# EAGLE board PCB (EAGLE 9.7.0)
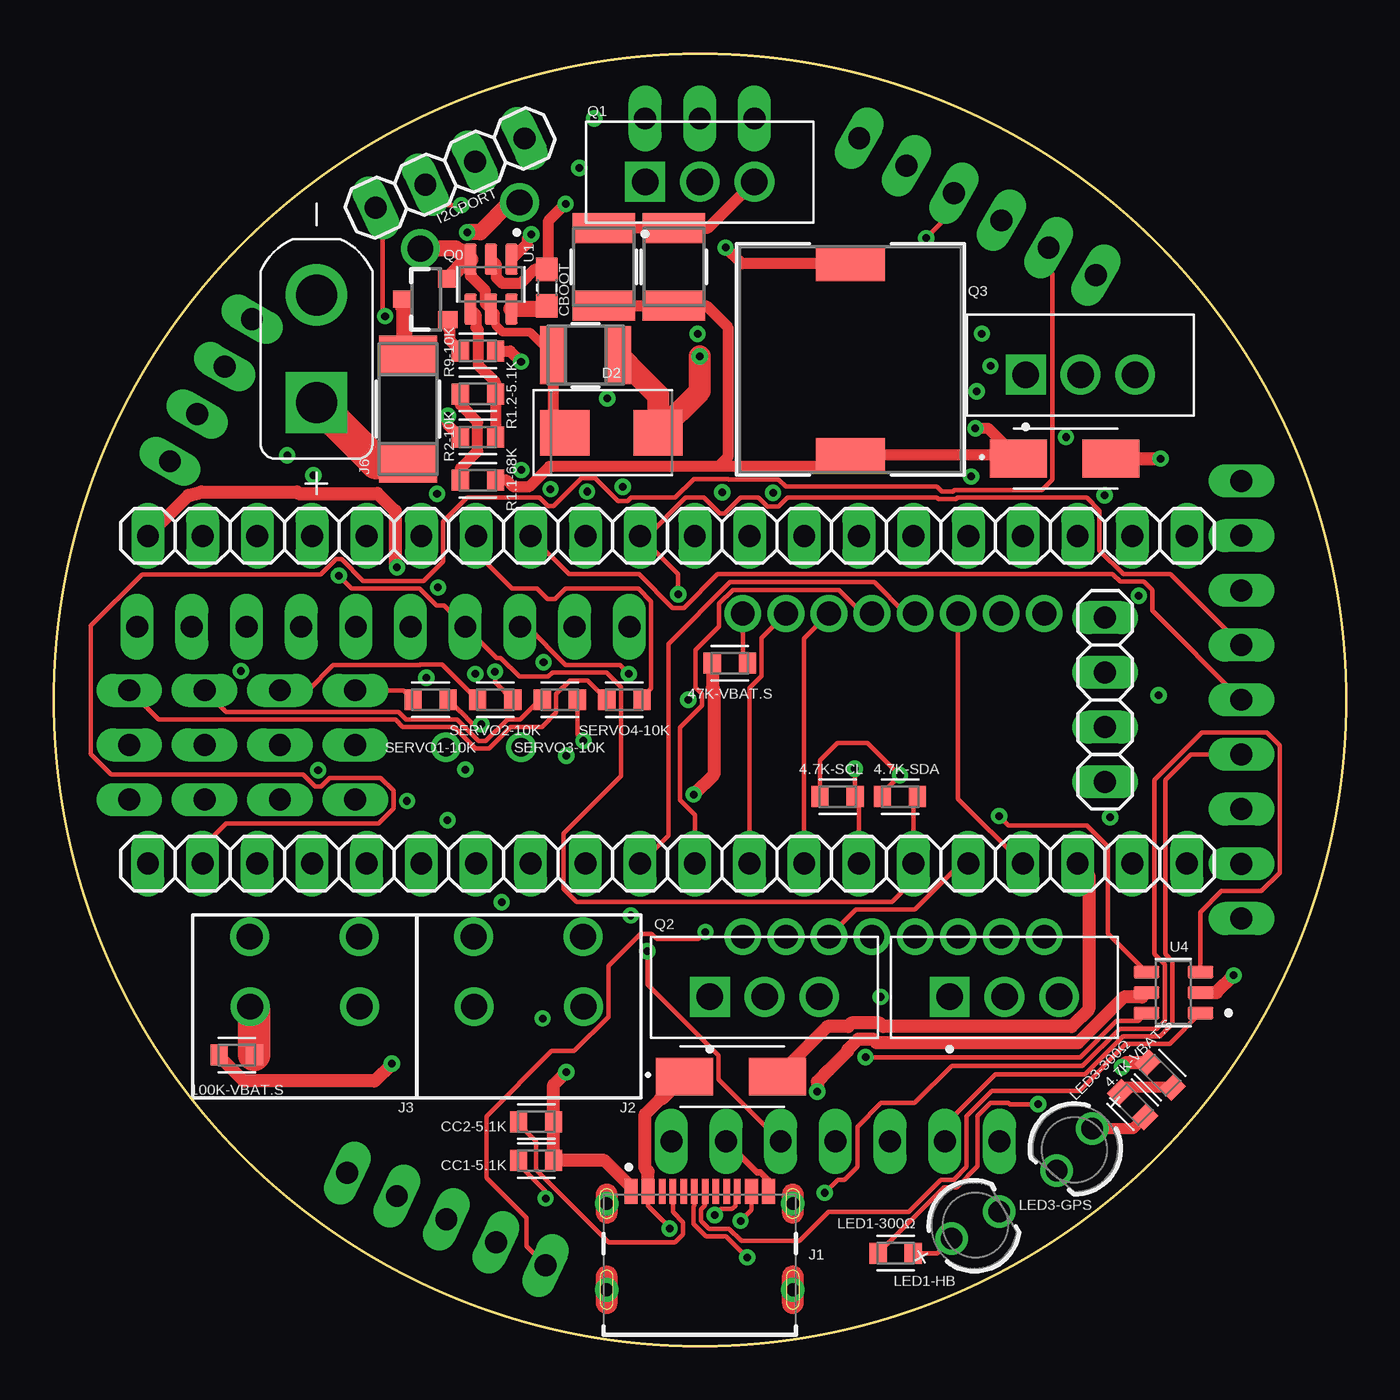
[diagram p0: board, top side]
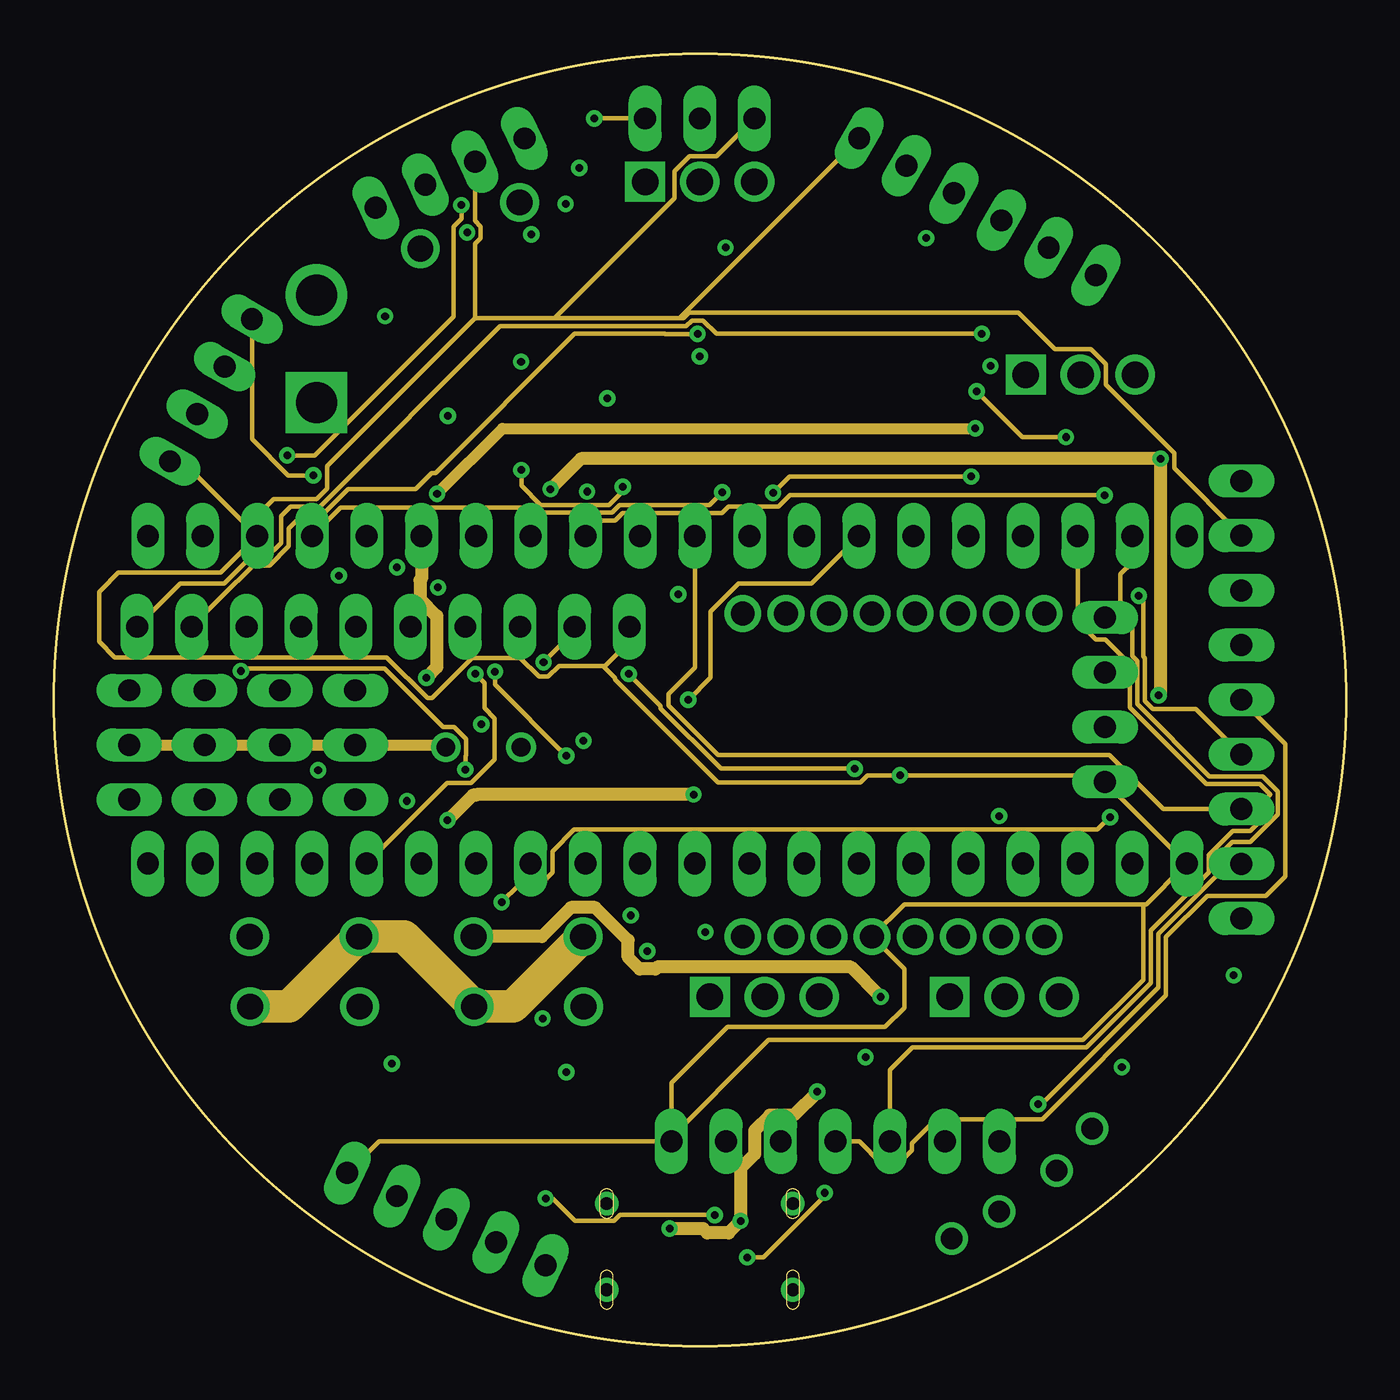
[diagram p1: board, inner layer Route2]
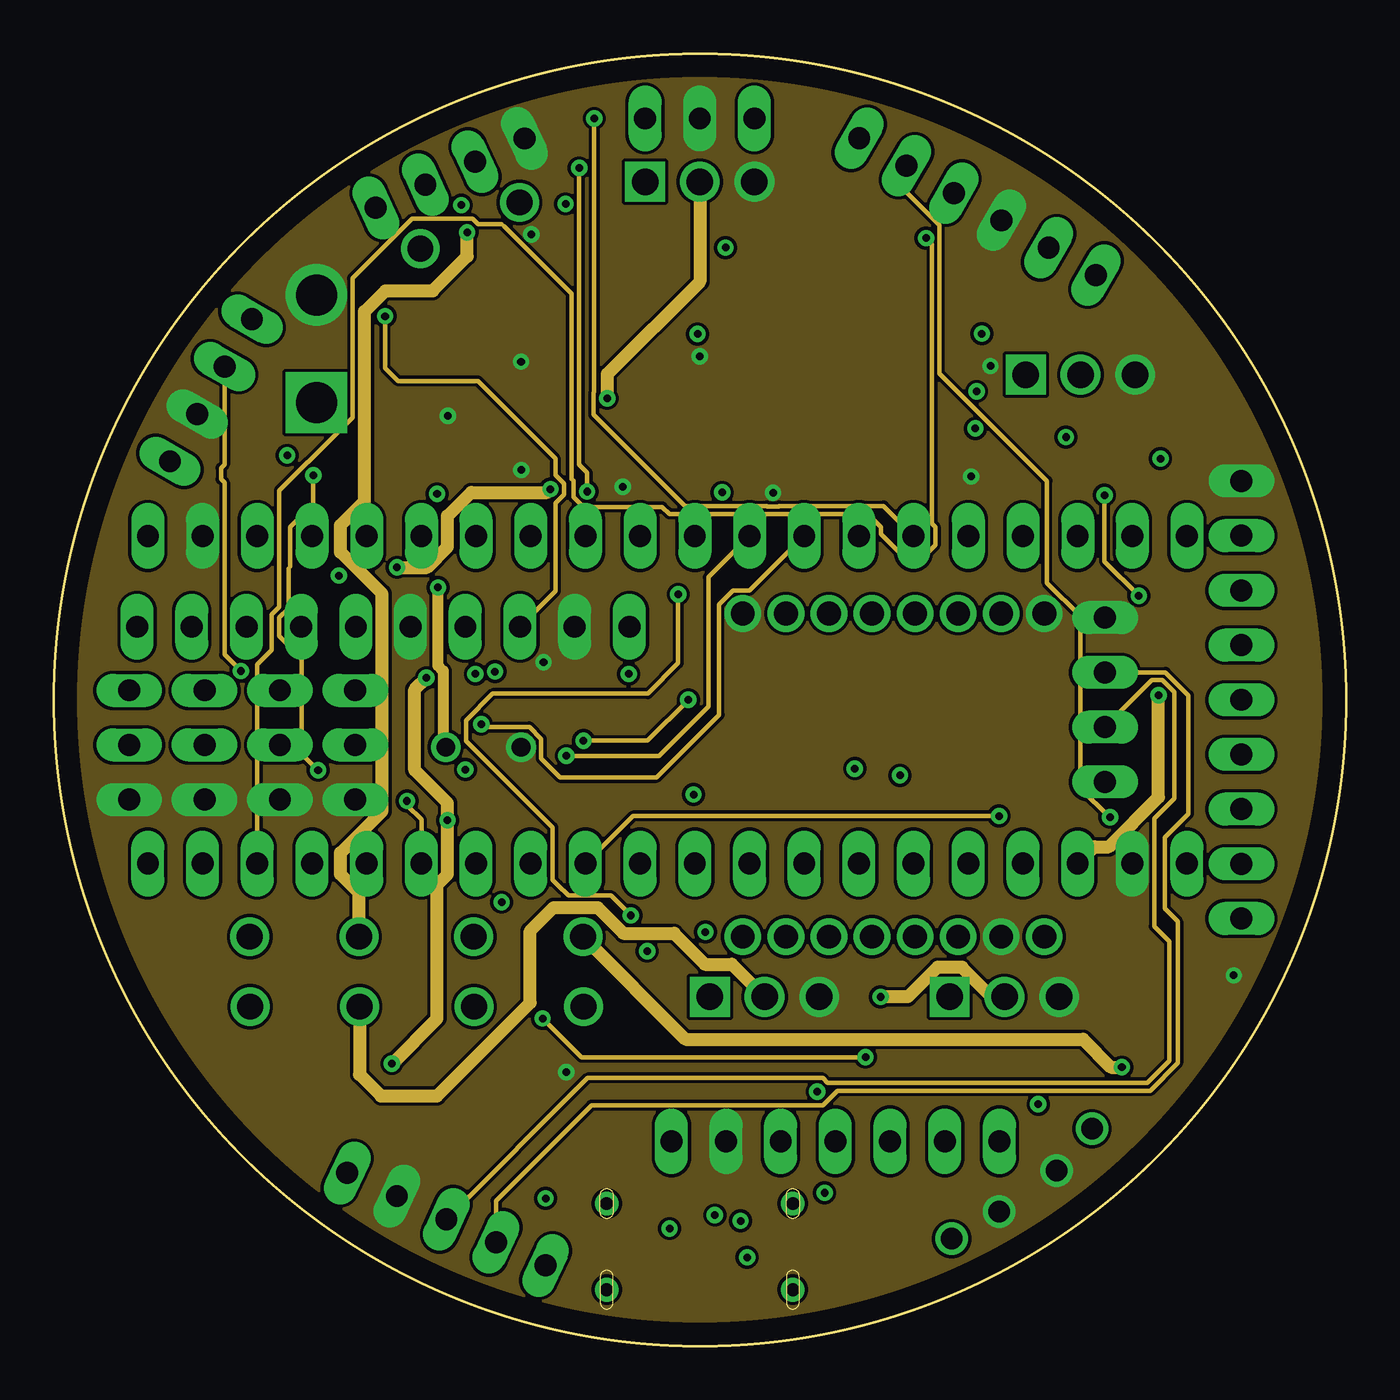
[diagram p2: board, inner layer Route15]
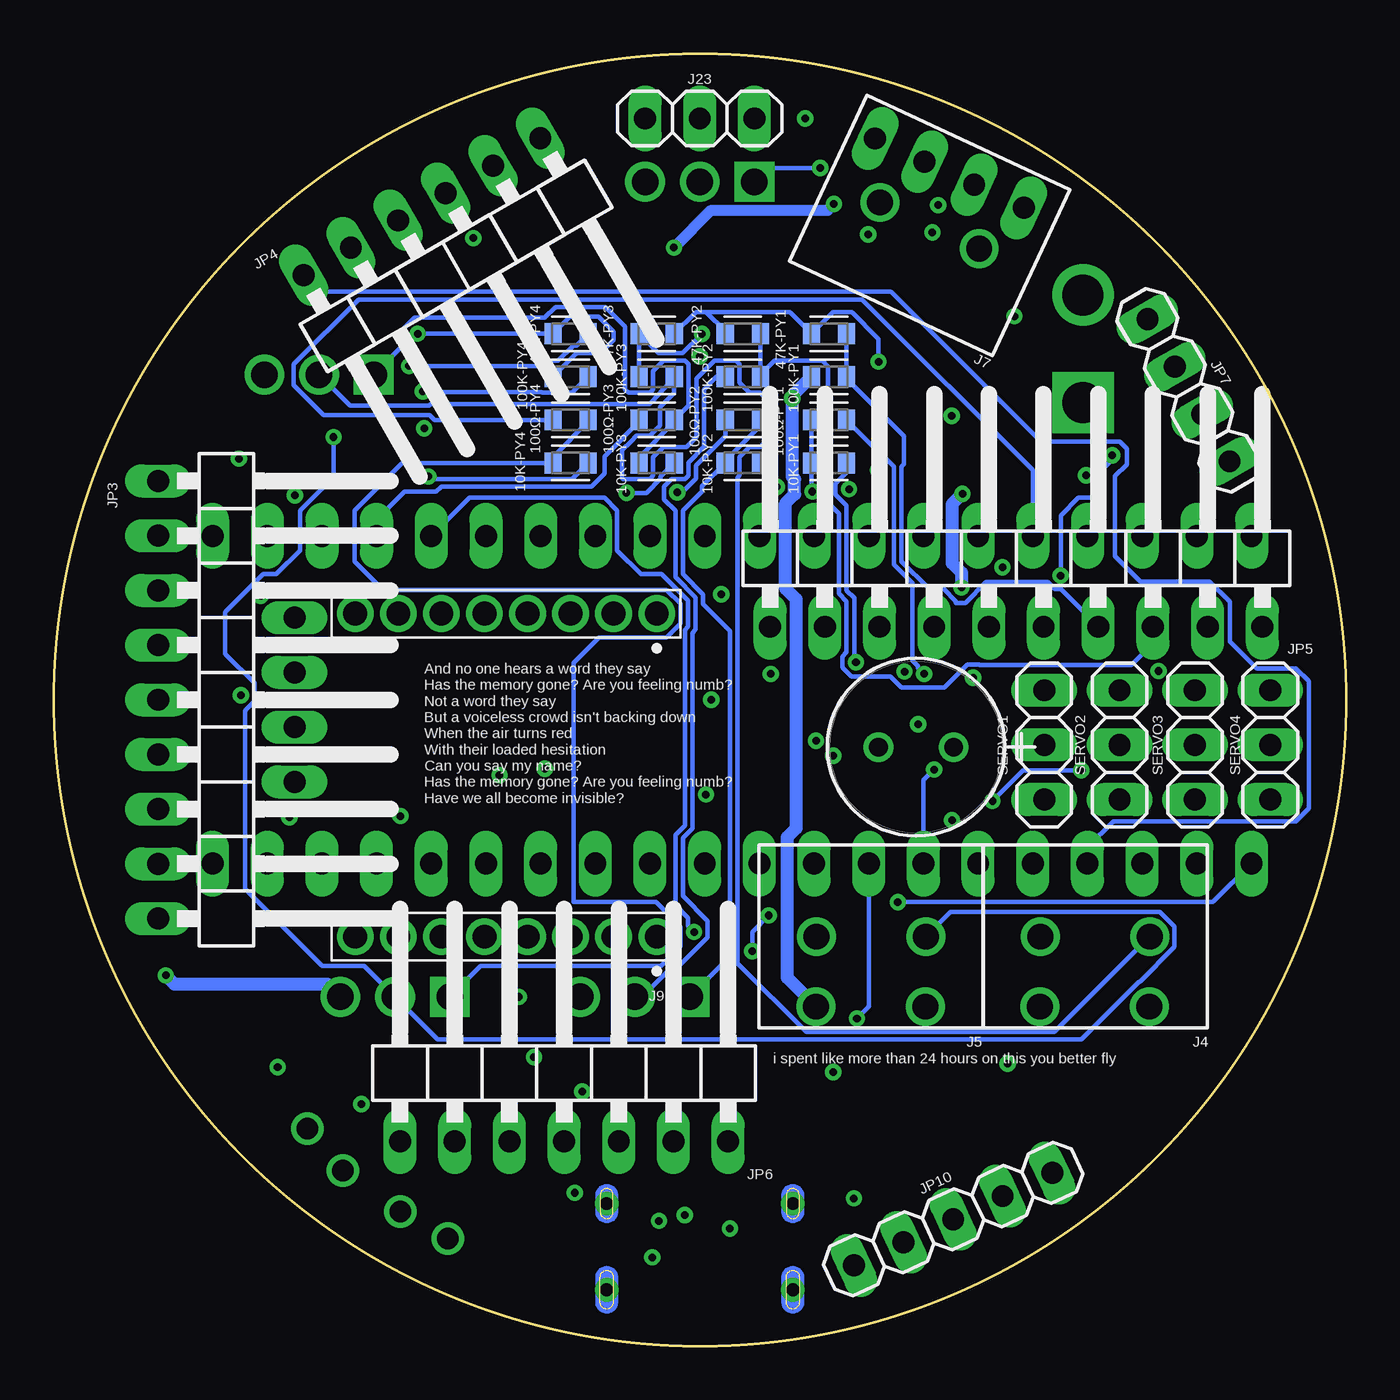
[diagram p3: board, bottom side, seen from below]

Size 60 x 60 mm. Coordinates in mm from the lower left corner, seen from the top.
Outline: circle at 30,30 radius 30
Copper layers (1+2*15+16): Top 0.035mm / dielectric 1.5mm / Route2 0.035mm / dielectric 0.15mm / Route15 0.035mm / dielectric 0.2mm / Bottom 0.035mm
Design rules "Fusion Electronics Design Rules *": minimum track width 6mil, minimum drill 0.35mm, track to track 6mil, track to pad 6mil, pad to pad 6mil, via to via 6mil, smd to smd 6mil, copper to edge 40mil, drill to drill 6mil, minimum pad ring 10mil, minimum via ring 8mil, stop-mask expansion 4mil, vias tented up to drill 9999mil, thermal gap 10mil

## Footprints (pad centres in the part's own frame; a part is rotated, then mirrored left to right if it is on the bottom)
RESC1608X60 = smd 0.799 x 0.974: 1 -0.815,0; 2 0.815,0
CAP_RN_8X11P5_NCH = drill 0.864 pad 1.372: 1 0,0; 2 3.5,0
CAP_C3225-250_TDK = smd 1.397 x 2.896: 1 -1.803,0; 2 1.803,0
CAPC1608X90 = smd 1.1 x 1: 1 -0.85,0; 2 0.85,0
CAP_GRM32DC_MUR = smd 1.168 x 2.692: 1 -1.524,0; 2 1.524,0
SMA = smd 2.65 x 1.75: P1 -2,0; P2 2.3,0
DIOM5336X265N = smd 2.284 x 2.124: 1 -2.164,0; 2 2.164,0
0452SERIES_LTF = smd 1.803 x 2.692: 1 -2.502,0; 2 2.502,0
1X04 = drill 1.016 long: 1 -3.81,0; 2 -1.27,0; 3 1.27,0; 4 3.81,0
GCT_USB4215-03-A_REVA = smd 0.6 x 1.15: A1_B12 -3.2,4.575; A4_B9 -2.4,4.575; B1_A12 3.2,4.575; B4_A9 2.4,4.575 | smd 0.3 x 1.15: A5 -1.25,4.575; A6 -0.25,4.575; A7 0.25,4.575; A8 1.25,4.575; B5 1.75,4.575; B6 0.75,4.575; B7 -0.75,4.575; B8 -1.75,4.575 | drill 0.6 pad 1: SH1 -4.32,4; SH2 4.32,4; SH3 -4.32,0; SH4 4.32,0
TERMBLK_508-2N = drill 1.2: 1 0,0; 2 5.08,0
AMASS_XT30UPB-M = drill 1.9: N 2.5,0 | drill 1.9 square: P -2.5,0
1X8_2MM_HEADER_MODEL = drill 1.105 pad 1.705: 1 0,0; 2 2,0; 3 4,0; 4 6,0; 5 8,0; 6 10,0; 7 12,0; 8 14,0
1X03 = drill 1.016 long: 1 -2.54,0; 2 0,0; 3 2.54,0
1X20 = drill 1.016 long: 1 -24.13,0; 2 -21.59,0; 3 -19.05,0; 4 -16.51,0; 5 -13.97,0; 6 -11.43,0; 7 -8.89,0; 8 -6.35,0; 9 -3.81,0; 10 -1.27,0; 11 1.27,0; 12 3.81,0; 13 6.35,0; 14 8.89,0; 15 11.43,0; 16 13.97,0; 17 16.51,0; 18 19.05,0; 19 21.59,0; 20 24.13,0
1X09/90 = drill 1.016 long: 1 -10.16,-3.81; 2 -7.62,-3.81; 3 -5.08,-3.81; 4 -2.54,-3.81; 5 0,-3.81; 6 2.54,-3.81; 7 5.08,-3.81; 8 7.62,-3.81; 9 10.16,-3.81
1X06/90 = drill 1.016 long: 1 -6.35,-3.81; 2 -3.81,-3.81; 3 -1.27,-3.81; 4 1.27,-3.81; 5 3.81,-3.81; 6 6.35,-3.81
1X10/90 = drill 1.016 long: 1 -11.43,-3.81; 2 -8.89,-3.81; 3 -6.35,-3.81; 4 -3.81,-3.81; 5 -1.27,-3.81; 6 1.27,-3.81; 7 3.81,-3.81; 8 6.35,-3.81; 9 8.89,-3.81; 10 11.43,-3.81
1X07/90 = drill 1.016 long: 1 -7.62,-3.81; 2 -5.08,-3.81; 3 -2.54,-3.81; 4 0,-3.81; 5 2.54,-3.81; 6 5.08,-3.81; 7 7.62,-3.81
1X05 = drill 1.016 long: 1 -5.08,0; 2 -2.54,0; 3 0,0; 4 2.54,0; 5 5.08,0
IND_NC_SUM = smd 1.6 x 3.2: 1 -4.445,0; 2 4.445,0
WL-TMRW_3MM = drill 1: 1 1.27,0; 2 -1.27,0
SOT23-3 = smd 0.9 x 0.8: 1 1,-0.95; 2 1,0.95; 3 -1.1,0
TO254P1054X469X1930-3 = drill 1.23 pad 1.85 square: 1 -2.54,-0.94 | drill 1.23 pad 1.85: 2 0,-0.94; 3 2.54,-0.94
SOT95P280X110-6N = smd 1.45 x 0.59: 1 -1.155,0.95; 2 -1.155,0; 3 -1.155,-0.95; 4 1.155,-0.95; 5 1.155,0; 6 1.155,0.95
SOT95P280X145-6N = smd 1.21 x 0.59: 1 -1.255,0.95; 2 -1.255,0; 3 -1.255,-0.95; 4 1.255,-0.95; 5 1.255,0; 6 1.255,0.95

## Placement (x,y rotation side)
4.7K-SCL  [RESC1608X60]  36.4,25.5 0 top
4.7K-SDA  [RESC1608X60]  39.3,25.5 0 top
4.7K-VBAT.S  [RESC1608X60]  51.38,12.56 135 top
10K-PY1  [RESC1608X60]  24,41 180 bottom
10K-PY2  [RESC1608X60]  28,41 180 bottom
10K-PY3  [RESC1608X60]  32,41 180 bottom
10K-PY4  [RESC1608X60]  36,41 180 bottom
47K-PY1  [RESC1608X60]  24,47 0 bottom
47K-PY2  [RESC1608X60]  28,47 0 bottom
47K-PY3  [RESC1608X60]  32,47 180 bottom
47K-PY4  [RESC1608X60]  36,47 180 bottom
47K-VBAT.S  [RESC1608X60]  31.4,31.7 0 top
100K-PY1  [RESC1608X60]  24,45 0 bottom
100K-PY2  [RESC1608X60]  28,45 0 bottom
100K-PY3  [RESC1608X60]  32,45 180 bottom
100K-PY4  [RESC1608X60]  36,45 180 bottom
100K-VBAT.S  [RESC1608X60]  8.5,13.5 0 top
100Ω-PY1  [RESC1608X60]  24,43 0 bottom
100Ω-PY2  [RESC1608X60]  28,43 180 bottom
100Ω-PY3  [RESC1608X60]  32,43 180 bottom
100Ω-PY4  [RESC1608X60]  36,43 180 bottom
C1  UKT1C471MPD1TDCAP_RN_8X11P5_NCH  [CAP_RN_8X11P5_NCH]  18.2,27.8 180 bottom
C2  22uf  [CAP_C3225-250_TDK]  25.54,50.1 270 top
C3  22uf  [CAP_C3225-250_TDK]  28.8,50.1 270 top
CBOOT  CC0603KRX7R6BB104  [CAPC1608X90]  22.9,49.14 270 top
CC1-5.1K  [RESC1608X60]  22.4,8.6 0 top
CC2-5.1K  [RESC1608X60]  22.4,10.4 0 top
CIN  0.1uf  [CAP_GRM32DC_MUR]  24.7,46 180 top
D1  SS14  [SMA]  46.8,41.2 0 top
D2  ZENERDO-214AA(SMB)  [DIOM5336X265N]  25.9,42.4 0 top
D3  SS14  [SMA]  31.3,12.5 0 top
F1  0452005.MRL0452SERIES_LTF  [0452SERIES_LTF]  16.45,43.5 90 top
I2CPORT  PINHD-1X4  [1X04]  18.41,54.46 205 top
J1  USB4215-03-A_REVAUSB4115-03-C_REVA  [GCT_USB4215-03-A_REVA]  30,2.6 0 top
J2  2828XX-2282837-2  [TERMBLK_508-2N]  24.6,15.75 180 top
J3  2828XX-2282837-2  [TERMBLK_508-2N]  14.2,15.75 180 top
J4  2828XX-2282837-2  [TERMBLK_508-2N]  9.1,19 180 bottom
J5  2828XX-2282837-2  [TERMBLK_508-2N]  19.5,19 180 bottom
J6  XT30UPB-M  [AMASS_XT30UPB-M]  12.2,46.3 90 top
J7  2828XX-2282837-2  [TERMBLK_508-2N]  21.63,53.1 335 bottom
J8  2PH1-08-UACONN8_2PH1_620X79_ADM  [1X8_2MM_HEADER_MODEL]  32,34 180 bottom
J9  2PH1-08-UACONN8_2PH1_620X79_ADM  [1X8_2MM_HEADER_MODEL]  32,19 180 bottom
J23  PINHD-1X3  [1X03]  30,57 0 bottom
JP1  PINHD-1X20  [1X20]  28.5,22.39 0 top
JP2  PINHD-1X20  [1X20]  28.5,37.61 180 top
JP3  PINHD-1X9/90  [1X09/90]  51.35,30 270 bottom
JP4  PINHD-1X6/90  [1X06/90]  41,49.6 210 bottom
JP5  PINHD-1X10/90  [1X10/90]  15.3,37.2 0 bottom
JP6  PINHD-1X7/90  [1X07/90]  36.3,13.3 0 bottom
JP7  PINHD-1X4  [1X04]  7.3,44.37 120 bottom
JP10  PINHD-1X5  [1X05]  18.23,5.87 205 bottom
JP11  PINHD-1X4  [1X04]  48.82,30 90 top
L1  CDRH104RNP-101NCIND_NC_SUM  [IND_NC_SUM]  37,45.8 90 top
LED1-300Ω  [RESC1608X60]  39.1,4.3 0 top
LED1-HB  WL-TMRW_3MM_WITHOUTSTOPPER  [WL-TMRW_3MM]  42.8,5.6 30 top
LED3-300Ω  [RESC1608X60]  50.1,11.2 315 top
LED3-GPS  WL-TMRW_3MM_WITHOUTSTOPPER  [WL-TMRW_3MM]  47.4,9.1 230 top
Q0  AO3401A  [SOT23-3]  17.3,48.6 0 top
Q1  IRLZ44N  [TO254P1054X469X1930-3]  30,55 0 top
Q2  IRLZ44N  [TO254P1054X469X1930-3]  33.01,17.14 0 top
Q3  IRLZ44N  [TO254P1054X469X1930-3]  47.68,46.04 0 top
Q4  IRLZ44N  [TO254P1054X469X1930-3]  44.15,17.14 0 top
R1.1-68K  [RESC1608X60]  19.7,40.2 0 top
R1.2-5.1K  [RESC1608X60]  19.7,44.2 180 top
R2-10K  [RESC1608X60]  19.7,42.2 0 top
R9-10K  [RESC1608X60]  19.7,46.2 180 top
SERVO1  PINHD-1X3  [1X03]  14,27.9 90 bottom
SERVO1-10K  [RESC1608X60]  17.5,30 0 top
SERVO2  PINHD-1X3  [1X03]  10.5,27.9 90 bottom
SERVO2-10K  [RESC1608X60]  20.5,30 0 top
SERVO3  PINHD-1X3  [1X03]  7,27.9 90 bottom
SERVO3-10K  [RESC1608X60]  23.5,30 0 top
SERVO4  PINHD-1X3  [1X03]  3.5,27.9 90 bottom
SERVO4-10K  [RESC1608X60]  26.5,30 0 top
U1  TPS54202DDCR  [SOT95P280X110-6N]  20.3,49.3 270 top
U4  USBLC6-2SC6  [SOT95P280X145-6N]  52,16.4 180 top

## Library data of the parts
4.7K-SCL 4.7K-SDA 4.7K-VBAT.S 10K-PY1-10K-PY4 47K-PY1-47K-PY4 47K-VBAT.S 100K-PY1-100K-PY4 100K-VBAT.S 100Ω-PY1-100Ω-PY4 CC1-5.1K CC2-5.1K LED1-300Ω LED3-300Ω R1.1-68K R1.2-5.1K R2-10K R9-10K SERVO1-10K SERVO2-10K SERVO3-10K SERVO4-10K = Resistor; CATEGORY: Resistors; DESCRIPTION: Chip Resistor 1.60 X 0.82 X 0.60 mm body 0603(1608-METRIC) Package; PACKAGE_SIZE: 0603; PACKAGE_TYPE: Surface Mount
C1 = CAP_RN_8X11P5_NCH; COPYRIGHT: Copyright (C) 2026 Ultra Librarian. All rights reserved.; MANUFACTURER_NAME: Nichicon; MANUFACTURER_PART_NUMBER: UKT1C471MPD1TD
C2 C3 = CAP_C3225-250_TDK; COPYRIGHT: Copyright (C) 2026 Ultra Librarian. All rights reserved.; MANUFACTURER_NAME: TDK; MANUFACTURER_PART_NUMBER: C3225X5R1C226M250AA
CBOOT = CC0603KRX7R6BB104
CIN = CAP_GRM32DC_MUR; COPYRIGHT: Copyright (C) 2026 Ultra Librarian. All rights reserved.; MANUFACTURER_NAME: Murata; MANUFACTURER_PART_NUMBER: GRM32DR71C106KA01L
D1 D3 = SS14; AVAILABILITY: In Stock; CHECK_PRICES: https://www.snapeda.com/parts/SS14/Onsemi/view-part/?ref=eda; DESCRIPTION: Diode Schottky 40 V 1A Surface Mount DO-214AC (SMA); MF: ON Semiconductor; MP: SS14; PACKAGE: SMA-2 ON Semiconductor; PRICE: None; PURCHASE-URL: https://www.snapeda.com/api/url_track_click_mouser/?unipart_id=1413348&manufacturer=ON Semiconductor&part_name=SS14&search_term=None; SNAPEDA_LINK: https://www.snapeda.com/parts/SS14/Onsemi/view-part/?ref=snap
D2 = Diode; CATEGORY: Diode; DESCRIPTION: Zener Diode - Generic Surface Mount DO-214AA(SMB); PACKAGE_SIZE: SMB; PACKAGE_TYPE: Surface Mount; SUBCATEGORY: Zener Diodes
F1 = 0452Series_LTF; COPYRIGHT: Copyright (C) 2026 Ultra Librarian. All rights reserved.; DIGI-KEY_PART_NUMBER_1: F2607CT-ND; DIGI-KEY_PART_NUMBER_2: F2607DKR-ND; DIGI-KEY_PART_NUMBER_3: F2607TR-ND; MANUFACTURER_NAME: Littelfuse Inc; MANUFACTURER_PART_NUMBER: 0452005.MRL
I2CPORT JP7 JP11 = Connector; CATEGORY: Connectors; DESCRIPTION: Header-Straight-4 Position; PACKAGE_TYPE: Through Hole; PITCH: 0.100" (2.54mm); SUBCATEGORY: Headers; TYPE: Male Pins
J1 = USB4215-03-A_REVA; CREATOR: Amina; MANUFACTURER: Global Connector Technology; MAXIMUM_PACKAGE_HEIGHT: 3.16mm; PARTREV: A; STANDARD: Manufacturer Recommendations; VERIFIER: Your name, use the same always
J2-J5 J7 = Connector; CATEGORY: Connectors; DATASHEET: https://www.te.com/usa-en/product-282837-2.datasheet.pdf; DESCRIPTION: 2 Position Wire to Board Terminal Block Horizontal with Board 0.200" (5.08mm) Through Hole; MANUFACTURER: TE Connectivity AMP Connectors; MPN: 282837-2; OPERATING_TEMPERATURE: -40°C ~ 105°C; PACKAGE_SIZE: NA; PACKAGE_TYPE: Through Hole; PART_STATUS: Active; PITCH: 0.200" (5.08mm); ROHS: Compliant; SERIES: Buchanan; SUBCATEGORY: Terminal Blocks; TYPE: Screw Terminal - Rising Cage Clamp Side Wire Entry
J6 = XT30UPB-M; AVAILABILITY: In Stock; CHECK_PRICES: https://www.snapeda.com/parts/XT30UPB-M/AMASS/view-part/?ref=eda; DESCRIPTION: Socket; DC supply; XT30; male; PIN: 2; on PCBs; THT; yellow; 15A; 500V; MF: amass; MP: XT30UPB-M; PACKAGE: None; PRICE: None; SNAPEDA_LINK: https://www.snapeda.com/parts/XT30UPB-M/AMASS/view-part/?ref=snap
J8 J9 = 1x8 2mm Header; COPYRIGHT: Copyright (C) 2026 Ultra Librarian. All rights reserved.; MANUFACTURER_NAME: ADAM TECHNOLOGIES INC; MANUFACTURER_PART_NUMBER: 2PH1-08-UA; TYPE: Headers, Male Pins
J23 SERVO1-SERVO4 = Connector; CATEGORY: Connectors; DESCRIPTION: Header-Straight-3 Position; PACKAGE_TYPE: Through Hole; PITCH: 0.100" (2.54mm); SUBCATEGORY: Headers; TYPE: Male Pins
JP1 JP2 = Connector; CATEGORY: Connectors; DESCRIPTION: Header-Straight-10 Position; PACKAGE_TYPE: Through Hole; PITCH: 0.100" (2.54mm); SUBCATEGORY: Headers; TYPE: Male Pins
JP3 = Connector; CATEGORY: Connectors; DESCRIPTION: Header-Right Angle-9 Position; PACKAGE_TYPE: Through Hole; PITCH: 0.100" (2.54mm); SUBCATEGORY: Headers; TYPE: Male Pins
JP4 = Connector; CATEGORY: Connectors; DESCRIPTION: Header-Right Angle-6 Position; PACKAGE_TYPE: Through Hole; PITCH: 0.100" (2.54mm); SUBCATEGORY: Headers; TYPE: Male Pins
JP5 = Connector; CATEGORY: Connectors; DESCRIPTION: Header-Right Angle-10 Position; PACKAGE_TYPE: Through Hole; PITCH: 0.100" (2.54mm); SUBCATEGORY: Headers; TYPE: Male Pins
JP6 = Connector; CATEGORY: Connectors; DESCRIPTION: Header-Right Angle-7 Position; PACKAGE_TYPE: Through Hole; PITCH: 0.100" (2.54mm); SUBCATEGORY: Headers; TYPE: Male Pins
JP10 = Connector; CATEGORY: Connectors; DESCRIPTION: Header-Straight-5 Position; PACKAGE_TYPE: Through Hole; PITCH: 0.100" (2.54mm); SUBCATEGORY: Headers; TYPE: Male Pins
L1 = IND_NC_SUM; COPYRIGHT: Copyright (C) 2026 Ultra Librarian. All rights reserved.; MANUFACTURER_NAME: Sumida; MANUFACTURER_PART_NUMBER: CDRH104RNP-101NC
LED1-HB LED3-GPS = WL-TMRW_3MM
Q0 = AO3401A; AVAILABILITY: In Stock; CHECK_PRICES: https://www.snapeda.com/parts/AO3401A/Alpha/view-part/?ref=eda; DESCRIPTION: P-Channel 30 V 4A (Ta) 1.4W (Ta) Surface Mount SOT-23-3; MF: Alpha & Omega Semiconductor; MP: AO3401A; PACKAGE: SOT-23 Alpha &amp; Omega Semiconductor; PRICE: None; SNAPEDA_LINK: https://www.snapeda.com/parts/AO3401A/Alpha/view-part/?ref=snap
Q1-Q4 = IRLZ44N; AVAILABILITY: Not in stock; CHECK_PRICES: https://www.snapeda.com/parts/IRLZ44N/Infineon/view-part/?ref=eda; DESCRIPTION: N-Channel 55 V 47A (Tc) 3.8W (Ta), 110W (Tc) Surface Mount D2PAK; MF: Infineon Technologies; MP: IRLZ44N; PACKAGE: TO-220 Infineon; PRICE: None; SNAPEDA_LINK: https://www.snapeda.com/parts/IRLZ44N/Infineon/view-part/?ref=snap
U1 = TPS54202DDCR; AVAILABILITY: In Stock; CHECK_PRICES: https://www.snapeda.com/parts/TPS54202DDCR/Texas+Instruments/view-part/?ref=eda; DESCRIPTION: 4.5V to 28V Input, 2A Output, EMI Friendly Synchronous Step-Down Converter; MF: Texas Instruments; MP: TPS54202DDCR; PACKAGE: SOT-23-THN-6 Texas Instruments; PRICE: None; PURCHASE-URL: https://www.snapeda.com/api/url_track_click_mouser/?unipart_id=565860&manufacturer=Texas Instruments&part_name=TPS54202DDCR&search_term=None; SNAPEDA_LINK: https://www.snapeda.com/parts/TPS54202DDCR/Texas+Instruments/view-part/?ref=snap
U4 = USBLC6-2SC6; AVAILABILITY: In Stock; CHECK_PRICES: https://www.snapeda.com/parts/USBLC6-2SC6/STMicroelectronics/view-part/?ref=eda; DESCRIPTION: 17V Clamp 5A (8/20µs) Ipp Tvs Diode Surface Mount SOT-23-6; MF: STMicroelectronics; MP: USBLC6-2SC6; PACKAGE: SOT-23-6 STMicroelectronics; PRICE: None; PURCHASE-URL: https://www.snapeda.com/api/url_track_click_mouser/?unipart_id=231887&manufacturer=STMicroelectronics&part_name=USBLC6-2SC6&search_term=None; SNAPEDA_LINK: https://www.snapeda.com/parts/USBLC6-2SC6/STMicroelectronics/view-part/?ref=snap

## Nets
3V3: 4.7K-SCL.1 4.7K-SDA.1 I2CPORT.2 J9.4 J23.1 JP1.20 JP2.18 JP3.2 JP4.1 JP5.1 JP6.7 JP7.1 JP10.1 JP11.1
5V: D1.P2 D3.P2 JP1.18 JP2.20
A0-AIN: J23.3 JP2.6
A1-SERVO3: JP2.7 SERVO3-10K.2
A2-SERVO1: JP2.8 SERVO1-10K.2
A3-SERVO2: JP2.9 SERVO2-10K.2
A4-CS: JP2.10 JP3.7
A5-SCL: JP2.11 JP3.4 JP6.5
A6-SDO: JP2.12 JP3.6 JP6.2
A7-SDA: JP2.13 JP3.5 JP6.4
A8-PY1: 100Ω-PY1.2 JP1.5
A9-RX: JP1.6 JP7.4
A10-TX: JP1.7 JP7.3
A11-D-: JP1.8 U4.6
A12-D+: JP1.9 U4.4
A15-NSS: J8.5 JP1.10
ALRT: JP5.6
ANT: J9.8
B0-SERVO4: JP2.14 SERVO4-10K.2
B1-VBAT.S: 47K-VBAT.S.1 100K-VBAT.S.1 JP2.15
B2-PY4: 100Ω-PY4.2 JP2.16
B3-SCK: J8.4 JP1.11
B4-MISO: J8.2 JP1.12
B5-MOSI: J8.3 JP1.13
B6-SCL: 4.7K-SCL.2 I2CPORT.4 JP1.14 JP5.3
B7-SDA: 4.7K-SDA.2 I2CPORT.3 JP1.15 JP5.4
B8-DIO0: J9.3 JP1.16
B9-RESET: J8.6 JP1.17
B10-PY2: 100Ω-PY2.2 JP2.17
B12-CS: JP1.1 JP4.2
B13-CLK: JP1.2 JP4.5
B14-D0: JP1.3 JP4.3
B15-D1: JP1.4 JP4.6
C13: JP2.2 LED1-300Ω.1
C14-CSB: JP2.3 JP6.3
C15-PY3: 100Ω-PY3.2 JP2.4
DIO1: J9.2
DIO2: J9.1
DIO3: J9.6
DIO4: J9.5
DIO5: J8.7
GND: 10K-PY1.1 10K-PY2.1 10K-PY3.1 10K-PY4.1 47K-PY1.1 47K-PY2.1 47K-PY3.1 47K-PY4.1 47K-VBAT.S.2 C1.2 C2.1 C3.1 CC1-5.1K.2 CC2-5.1K.2 CIN.1 D2.2 I2CPORT.1 J1.A1_B12 J1.B1_A12 J6.N J8.1 J8.8 J9.7 J23.2 JP1.19 JP2.19 JP3.1 JP4.4 JP5.2 JP5.5 JP6.6 JP7.2 JP10.2 JP11.4 LED1-HB.1 LED3-GPS.1 Q1.3 Q2.3 Q3.3 Q4.3 R2-10K.1 R9-10K.1 SERVO1.1 SERVO2.1 SERVO3.1 SERVO4.1 U1.1 U4.2
INT1: JP3.8
INT2: JP3.9
N$1: LED1-300Ω.2 LED1-HB.2
N$2: Q0.1 R9-10K.2
N$3: 10K-PY1.2 100Ω-PY1.1 Q1.1
N$4: 100K-PY1.1 J2.1 Q1.2
N$5: 10K-PY2.2 100Ω-PY2.1 Q2.1
N$6: 100K-PY2.1 J3.1 Q2.2
N$7: 4.7K-VBAT.S.2 100K-VBAT.S.2 J2.2 J3.2 J4.2 J5.2 J7.1
N$8: 10K-PY3.2 100Ω-PY3.1 Q3.1
N$9: 100K-PY3.1 J4.1 Q3.2
N$10: LED3-300Ω.2 LED3-GPS.2
N$11: CC2-5.1K.1 J1.A5
N$12: 10K-PY4.2 100Ω-PY4.1 Q4.1
N$13: 100K-PY4.1 J5.1 Q4.2
N$14: CC1-5.1K.1 J1.B5
N$15: J1.A7 U4.1
N$16: J1.A6 U4.3
N$17: 4.7K-VBAT.S.1 LED3-300Ω.1
N$18: CBOOT.2 U1.6
N$19: R1.2-5.1K.1 R2-10K.2 U1.4
N$20: CBOOT.1 L1.2 U1.2
N$21: CIN.2 D2.1 J7.2 Q0.2 U1.3 U1.5
N$22: R1.1-68K.1 R1.2-5.1K.2
N$23: F1.2 Q0.3
N$24: F1.1 J6.P
N$25: D3.P1 J1.A4_B9 J1.B4_A9 U4.5
NRST: JP2.5 JP10.5
PA13-SWDIO: JP10.3 JP11.2
PA14-SWCLK: JP10.4 JP11.3
PS: JP6.1
PY1-A0: 47K-PY1.2 100K-PY1.2 JP5.7
PY2-A1: 47K-PY2.2 100K-PY2.2 JP5.8
PY3-A2: 47K-PY3.2 100K-PY3.2 JP5.9
PY4-A3: 47K-PY4.2 100K-PY4.2 JP5.10
SIG: SERVO1-10K.1 SERVO1.3
SIG1: SERVO2-10K.1 SERVO2.3
SIG2: SERVO3-10K.1 SERVO3.3
SIG3: SERVO4-10K.1 SERVO4.3
V: C1.1 C2.2 C3.2 D1.P1 L1.1 R1.1-68K.2 SERVO1.2 SERVO2.2 SERVO3.2 SERVO4.2
VB: JP2.1
VS: JP3.3

## Tracks (layer width: path | path; a pad name or v marks a point on that pad's centre or on a via)
3V3  (via drill 0.35)
  Top 0.2: 4.7K-SDA.1 38.48,25.68 v39.3,26.49 37.79,28 36.4,28 35.59,27.18 4.7K-SCL.1
  Route2 0.2: JP7.1 5.99,41.07 JP2.18 | 23.26,47.72 19.56,47.72 | J23.1 30.77,55.23 29.51,55.23 28.82,54.55 28.82,53.28 23.26,47.72 | JP4.1 29.05,47.72 | 29.05,47.72 26.6,47.72 23.26,47.72 | JP5.1 26.73,32.7 25.61,31.58 25.5,31.58 | JP1.20 52.47,22.23 | 52.47,22.23 50.74,20.5 50.6,20.5 | 50.6,20.5 39.6,20.5 39.5,20.5 J9.4 39.5,17.5 39.5,15.7 38.6,14.8 33.6,14.8 31.28,14.8 28.68,12.2 JP6.7 | 52.47,22.23 52.47,22.54 JP11.1 48.52,26.49 v39.3,26.49 37.78,26.49 37.46,26.17 30.84,26.17 26.07,30.94 26.07,31.01 25.5,31.58 | 50.6,20.5 50.6,17 47.8,14.2 33.2,14.2 31.6,12.6 29.98,10.98 28.68,9.68 JP6.7 | JP3.2 52.03,40.75 52.03,41.46 48.86,44.64 48.86,45.59 48.17,46.27 46.5,46.27 44.81,47.97 29.49,47.97 29.24,47.72 29.05,47.72 | JP2.18 7.74,35.9 6.1,35.9 3,35.9 2.2,35.1 2.1,35 2.1,32.7 2.83,31.97 15.46,31.97 17.36,30.07 17.56,30.07 19.43,31.94 21.66,31.94 22.53,31.07 22.96,31.07 23.47,31.58 25.5,31.58 | 19.56,47.72 12.68,40.84 12.68,39.8 12.21,39.33 10.2,39.33 9.45,38.58 JP2.18 | JP6.7 15.1,9.49 JP10.1 | I2CPORT.2 19.56,52.24 19.83,51.97 19.83,51.45 19.56,51.18 19.56,47.72
5V  (via drill 0.35)
  Top 0.6: D1.P2 v51.4,41.2 | JP2.20 6.25,39.49 6.85,39.65 11.29,39.65 11.35,39.59 15.03,39.59 15.86,38.76 15.86,36.34 15.94,36.26 v15.94,36.15 | D3.P2 35.92,14.82 36.88,14.82 37.04,14.98 38.36,14.98 38.52,14.82 47.26,14.82 48.07,15.63 48.07,21.87 JP1.18
  Route2 0.6: v51.3,30.2 51.4,30.3 v51.4,41.2 24.48,41.2 v23.07,39.78
  Route15 0.6: JP1.18 48.33,23.17 49,23.17 51.3,25.48 v51.3,30.2 | v15.94,36.15 17.33,36.15 18.28,37.11 18.28,38.53 19.38,39.63 22.92,39.63 v23.07,39.78
A0-AIN  (via drill 0.35)
  Route2 0.2: J23.3 v25.1,57
  Route15 0.2: v25.1,57 25.1,44.29 25.07,44.26 25.07,43.24 29.31,39 33.11,39 33.14,38.97 33.66,38.97 33.69,39 38.54,39 JP2.6
A1-SERVO3  (via drill 0.35)
  Top 0.2: SERVO3-10K.2 24.32,28.39 v24.6,28.1
  Route2 0.2: JP2.7 35.18,35.4 31.8,35.4 30.5,34.1 30.5,31.03 v29.47,30
  Route15 0.2: v24.6,28.1 27.57,28.1 v29.47,30
A2-SERVO1  (via drill 0.35)
  Top 0.2: SERVO1-10K.2 18.87,29.44 18.88,29.44 19.46,28.87 v19.85,28.87
  Route15 0.2: JP2.8 32.32,35.08 31.55,35.08 30.9,34.43 30.9,29.3 28,26.4 23.5,26.4 22.64,27.26 22.64,28.19 22.09,28.74 19.98,28.74 v19.85,28.87
A3-SERVO2  (via drill 0.35)
  Top 0.2: v20.49,31.31 20.49,30.82 SERVO2-10K.2
  Route2 0.2: v23.8,27.4 20.49,30.71 v20.49,31.31
  Route15 0.2: v23.8,27.4 28.1,27.4 30.39,29.7 30.39,35.7 JP2.9
A4-CS
  Route2 0.2: JP3.7 51.52,24.92 49.01,27.43 30.85,27.43 28.54,29.74 28.54,30.26 29.77,31.49 JP2.10
A5-SCL  (via drill 0.35)
  Top 0.2: JP3.4 51.87,35.83 49.67,35.83 48.56,36.94 48.56,38.79 47.97,39.39 41.98,39.39 41.91,39.32 41.09,39.32 41.02,39.39 34.08,39.39 33.66,38.97 33.15,38.97 32.73,39.39 31.89,39.39 31.15,38.65 30.93,38.65 30.19,39.39 29.35,39.39 27.57,37.61 JP2.11 29,35.84 v29,34.9 | JP6.5 30.88,12.37 30.88,13.48 27.58,16.77 27.58,18.29 v27.56,18.32
  Route15 0.2: v29,34.9 29,31.7 27.59,30.29 20.38,30.29 19.14,29.05 19.14,28.09 23.16,24.07 23.16,21.64 23.4,21.4 23.89,20.91 25.88,20.91 v26.8,19.98
  Bottom 0.2: v26.8,19.98 27.56,19.23 v27.56,18.32
A6-SDO  (via drill 0.35)
  Top 0.2: JP3.6 52.8,27.46 51.62,26.28 51.62,18.19 51.95,17.85 51.95,14.95 51.38,14.37 49.65,14.37 47.88,12.59 43.72,12.59 41.38,10.25 JP6.2
  Route2 0.2: v50.39,34.83 50.49,34.93 50.6,34.93 50.6,32.02 50.67,31.95 50.67,29.94 51.04,29.57 53.05,29.57 JP3.6 | v48.8,39.5 34.19,39.5 33.66,38.97 31.33,38.97 31.03,38.67 26.41,38.67 26.07,38.33 25.41,38.33 JP2.12
  Route15 0.2: v50.39,34.83 48.8,36.42 v48.8,39.5
A7-SDA
  Top 0.2: JP2.13 23.93,35.83 27.18,35.83 28.74,34.27 29.26,34.27 30.82,35.83 49.17,35.83 49.52,35.48 50.63,35.48 51.02,35.09 51.02,34.14 JP3.5
  Route2 0.2: JP3.5 57.2,27.95 57.2,21.8 56.3,20.9 53.57,20.9 51.66,18.99 51.66,16.26 45.9,10.5 40.96,10.5 39.85,9.4 39.85,9.07 39.26,8.48 38.42,8.48 37.41,9.49 JP6.4
A8-PY1  (via drill 0.35)
  Route2 0.2: JP1.5 18.27,26.13 19.38,26.13 20.48,27.23 20.48,29.13 20,29.61 20,30.78 v19.58,31.2
  Bottom 0.2: 100Ω-PY1.2 21.48,41.3 21.45,41.3 20.98,40.82 20.98,36.28 20.12,35.43 20.12,31.83 19.86,31.57 19.86,31.48 v19.58,31.2
A9-RX  (via drill 0.35)
  Route2 0.2: JP7.4 9.2,42.1 10.88,40.42 v12.05,40.42
  Route15 0.2: JP1.6 17.07,24.43 16.41,25.09 v16.41,25.3 | v12.05,40.42 12.05,39.11 10.98,38.03 10.98,36.18 10.9,36.1 10.9,34.23 10.48,33.81 10.48,32.97 11.51,31.93 11.51,27.49 v12.28,26.72
  Bottom 0.2: v12.28,26.72 14.98,26.72 v16.41,25.3
A10-TX  (via drill 0.35)
  Route2 0.2: v8.7,31.34 8.81,31.45 15.37,31.45 18.08,28.74 18.59,28.74 19.14,28.19 19.14,27.41 19.12,27.39 v19.12,26.76
  Route15 0.2: v8.7,31.34 7.93,32.1 7.93,40.08 7.77,40.24 7.77,40.76 7.93,40.92 JP7.3
  Bottom 0.2: JP1.7 19.61,26.27 v19.12,26.76
A11-D-  (via drill 0.35)
  Top 0.2: v37.7,13.4 47.68,13.4 49.36,15.08 50.37,15.08 U4.6
  Route15 0.2: v37.7,13.4 24.5,13.4 v22.7,15.2
  Bottom 0.2: JP1.8 22.15,15.75 v22.7,15.2
A12-D+  (via drill 0.35)
  Top 0.2: U4.4 48.95,19.14 48.95,23.18 47.97,24.17 45.33,24.17 44.33,24.17 v43.9,24.6
  Route15 0.2: v43.9,24.6 26.9,24.6 JP1.9
A15-NSS
  Top 0.2: J8.5 39.56,34 38.11,35.46 31.4,35.46 28.54,32.6 28.54,23.7 JP1.10
B0-SERVO4
  Top 0.2: JP2.14 19.61,36.85 21.29,35.17 22.44,35.17 22.94,34.67 23.27,34.67 23.77,35.17 27.15,35.17 27.74,34.57 27.74,30.52 27.32,30.09 SERVO4-10K.2
B1-VBAT.S  (via drill 0.35)
  Top 0.6: v15.7,13.1 14.9,12.3 8.82,12.3 7.68,13.43 100K-VBAT.S.1 | 47K-VBAT.S.1 30.59,30.56 30.65,30.49 30.65,26.54 v29.71,25.6
  Route2 0.6: v17.3,31.02 17.78,31.5 17.78,33.89 17.01,34.67 17.01,35.55 17.07,35.61 JP2.15 | v29.71,25.6 19.63,25.6 19.61,25.58 19.46,25.58 v18.28,24.4
  Route15 0.6: v15.7,13.1 17.8,15.2 17.8,21.4 18.28,21.89 v18.28,24.4 18.28,25.21 16.76,26.73 16.76,30.48 v17.3,31.02
B2-PY4
  Bottom 0.2: JP2.16 14.53,40.66 22.46,48.59 45.85,48.59 48.86,45.59 48.86,44.61 47.48,43.23 42.54,43.23 42.31,43 100Ω-PY4.2
B3-SCK
  Top 0.2: J8.4 37.56,34 36.46,35.11 31.54,35.11 30.89,34.46 30.89,33.4 29.8,32.3 29.8,30.56 30.1,30.26 30.1,29.74 29.08,28.72 29.08,25.34 29.77,24.65 JP1.11
B4-MISO
  Top 0.2: JP1.12 32.31,30.55 32.87,31.11 32.87,32.87 J8.2
B5-MOSI
  Top 0.2: JP1.13 34.85,32.85 J8.3
B6-SCL  (via drill 0.35)
  Top 0.2: JP1.14 37.39,23.15 37.39,25.32 | 37.39,25.32 4.7K-SCL.2 | 37.39,25.32 4.7K-SCL.2 | JP5.3 21.99,33.39 23.77,31.61 26.29,31.61 v26.7,31.2 | v37.2,26.8 37.22,26.79 4.7K-SCL.2 | I2CPORT.4 15.26,52.54 15.26,47.94 v15.39,47.81
  Route2 0.2: v26.7,31.2 28.19,29.71 28.19,29.59 30.98,26.8 v37.2,26.8
  Route15 0.2: JP5.3 23.3,35.04 23.3,39.12 23.7,39.52 23.7,40.04 23.3,40.44 23.3,41.2 19.7,44.8 16,44.8 15.39,45.41 v15.39,47.81
B7-SDA  (via drill 0.35)
  Top 0.2: 4.7K-SDA.2 39.93,25.32 JP1.15 39.93,21.63 38.92,20.61 24.27,20.61 23.68,21.21 23.68,23.79 26.34,26.45 26.34,30.59 25.67,31.26 23.15,31.26 22.96,31.07 21.62,31.07 20.75,31.94 20.56,31.94 JP5.4 18.13,34.37 17.79,34.37 16.99,35.17 13.83,35.17 v13.23,35.77 | I2CPORT.3 18.21,52.97 v18.93,52.97
  Route2 0.2: v10.84,41.35 12.12,41.35 18.57,47.8 18.57,51.97 18.93,52.33 v18.93,52.97
  Bottom 0.2: v13.23,35.77 13.23,38.56 12.41,39.39 11.84,39.39 11.42,39.8 11.42,40.57 10.84,41.15 v10.84,41.35
B8-DIO0
  Top 0.2: J9.3 37.26,20.26 40,20.26 42.13,22.39 JP1.16
B9-RESET
  Top 0.2: J8.6 42,25.4 JP1.17
B10-PY2  (via drill 0.35)
  Route2 0.2: v31.04,39.63 30.44,39.03 26.27,39.03 25.92,38.69 22.47,38.69 22.22,38.94 13.32,38.94 JP2.17
  Bottom 0.2: 100Ω-PY2.2 28.82,42.24 30.18,40.88 30.18,40.26 30.73,39.72 30.95,39.72 v31.04,39.63
B12-CS  (via drill 0.35)
  Route2 0.2: v20.8,20.6 21.58,21.38 22.57,21.38 23.16,21.97 23.16,22.96 24.17,23.97 48.48,23.97 v49.05,24.55
  Route15 0.2: JP4.2 39.61,53.58 41.14,52.04 41.14,45.15 46.13,40.16 46.13,35.43 47.69,33.88 47.69,25.89 49.03,24.55 v49.05,24.55
  Bottom 0.2: JP1.1 6.16,20.6 v20.8,20.6
B13-CLK
  Top 0.2: JP4.5 45.82,50.34 46.38,49.78 46.38,40.22 45.9,39.74 41.83,39.74 41.76,39.67 41.24,39.67 41.02,39.89 34.01,39.89 33.66,40.23 31.33,40.23 31.3,40.26 29.73,40.26 28.85,39.39 26.81,39.39 26.65,39.22 26.21,39.22 25.13,40.3 24.5,40.3 23.21,39 22.95,39 22.57,39.39 19.19,39.39 18.08,38.28 18.08,36.43 17.18,35.52 14.37,35.52 13.36,36.53 13.11,36.53 12.4,35.82 4.1,35.82 1.72,33.44 1.72,27.48 2.66,26.54 11.57,26.54 12.14,25.97 12.41,25.97 12.82,26.37 15.18,26.37 15.78,25.78 15.78,24.94 15.09,24.26 8.01,24.26 6.91,23.15 JP1.2 | JP4.5
B14-D0  (via drill 0.35)
  Top 0.2: JP4.3 41.2,52.93 41.2,52.13 v40.51,51.44
  Route15 0.2: JP1.3 9.45,31.64 10.12,32.31 10.12,33.96 10.47,34.3 10.47,39.73 11.79,41.05 11.82,41.05 13.88,43.11 13.88,49.57 16.65,52.34 19.46,52.34 19.7,52.1 20.8,52.1 20.9,52 24.05,48.85 24.05,40.26 24.14,40.17 24.14,39.41 24.59,38.95 28.26,38.95 28.59,38.62 32.98,38.62 32.99,38.62 33.81,38.62 37.81,38.62 38.4,38.03 38.4,37.7 39.51,36.6 40.35,36.6 40.94,37.19 40.94,38.03 40.79,38.19 40.79,51.16 v40.51,51.44
B15-D1
  Bottom 0.2: JP4.6 48.02,49.06 47.9,48.94 21.13,48.94 14.16,41.98 10.49,41.98 10.17,41.66 10.17,40.93 10.72,40.38 10.72,36.68 9.54,35.5 6.32,35.5 5.39,34.57 5.39,32.71 4.13,31.45 2.32,31.45 1.72,30.86 1.72,24.94 2.32,24.35 10.8,24.35 11.99,23.15 JP1.4
C13  (via drill 0.35)
  Top 0.2: LED1-300Ω.1 41.35,7.36 41.95,7.36 42.91,8.32 42.91,10.67 43.5,11.27 44.34,11.27 44.39,11.21 v45.72,11.21
  Route2 0.2: JP2.2 50.09,36.38 49.54,35.83 49.54,34.57 50.09,34.02 50.09,32.03 50.32,31.8 50.32,29.8 53.67,26.45 56.15,26.45 56.85,25.75 56.85,24.68 55.57,23.39 54.74,23.39 54,22.65 54,21.82 51.3,19.13 51.3,16.64 45.88,11.21 v45.72,11.21
C14-CSB
  Route2 0.2: JP2.3 47.55,33.65 48.4,32.8 48.83,32.8 49.97,31.65 49.97,29.65 53.53,26.09 56.01,26.09 56.5,25.6 56.17,25.27 56.17,24.5 55.58,23.91 54.75,23.91 53.64,22.8 53.64,21.97 50.95,19.28 50.95,16.85 47.95,13.85 39.87,13.85 38.84,12.82 JP6.3
C15-PY3
  Bottom 0.2: JP2.4 45.01,38.37 43.71,39.67 42.24,39.67 42,39.91 35.03,39.91 34.43,40.51 34.43,41.3 32.81,42.91 100Ω-PY3.2
GND  (via drill 0.35)
  Top 0.2: 47K-VBAT.S.2 32,31.91 J8.1
  Top 0.3: JP6.6 32.66,8.05 32.83,8.05 33.2,7.68 J1.B1_A12
  Top 0.5: C2.1 C3.1 30.38,51.9 Q1.3 | R9-10K.1 21.2,46.2 v21.7,45.7 | U1.1 22,51.2 22,51.43 v22.18,51.61 | R2-10K.1 18.3,42.79 v18.3,43.18
  Top 0.6: U4.2 54,16.4 v54.8,17.2 | J1.A1_B12 26.8,7.38 25.57,8.6 CC1-5.1K.2 CC2-5.1K.2 23.21,12.11 v23.8,12.7
  Top 1.016: CIN.1 27.21,45.01 28.06,44.16 D2.2 30,44.34 v30,45.95
  Route2 0.2: JP5.2 24.19,33.19 v22.75,31.75 | v33.4,39.6 34.17,40.37 v42.6,40.37 | v21.71,40.67 21.71,39.94 22.62,39.04 25.78,39.04 26.43,39.69 v26.43,39.9
  Bottom 0.2: 10K-PY4.1 35.92,40.26 42.49,40.26 v42.6,40.37 | 10K-PY3.1 31.81,40.37 31.81,40.26 32.47,39.6 v33.4,39.6 | v43.5,45.5 37.56,45.5 37.32,45.74 36.57,45.74 35.86,46.45 35.73,46.45 47K-PY4.1 | 47K-PY3.1 30.18,48 29.7,48 | 29.7,48 28.82,47.11 47K-PY2.1 | 29.7,48 25.82,48 47K-PY1.1 23.82,48 23.2,48 22.94,48 21.7,46.76 v21.7,45.7 | 10K-PY1.1 23.18,40.55 23.7,40.04 23.7,39.52 23.18,39.01 23.18,35.08 22.82,34.72 22.82,31.82 v22.75,31.75 | 10K-PY2.1 26.67,40.48 26.67,40.14 v26.43,39.9
  Bottom 0.6: v54.8,17.2 54.4,16.8 47.29,16.8 Q4.3
  pour Route15 (no thermals): -7.07,-13.82 74.27,-13.82 80.12,-7.97 80.12,65.07 79.07,66.12 -11.23,66.12 -18.32,-2.57
N$1
  Top 0.2: LED1-HB.2 41.03,4.3 LED1-300Ω.2
N$2
  Top 0.5: R9-10K.2 18.4,46.69 18.4,47.17 18.3,47.27 Q0.1
N$3  (via drill 0.35)
  Route15 0.2: v24.4,54.7 24.4,40.92 24.77,40.55 v24.77,39.67
  Bottom 0.2: 100Ω-PY1.1 10K-PY1.2 24.82,39.72 v24.77,39.67 | v24.4,54.7 26.82,54.7 Q1.1
N$4  (via drill 0.35)
  Route15 0.6: Q1.2 30,49.43 25.7,45.13 v25.7,44
  Bottom 0.6: J2.1 25.93,17.08 25.93,23.63 25.52,24.04 25.52,34.66 26.02,35.16 26.02,39.13 25.6,39.55 25.6,40.24 25.7,40.34 v25.7,44 25.7,44.12 100K-PY1.1
N$5
  Bottom 0.2: 100Ω-PY2.1 27.18,42.74 28.82,41.11 10K-PY2.2 29.9,39.91 29.9,39.68 30.78,38.79 30.78,35.84 29.84,34.9 29.84,34.44 28.6,33.2 28.6,23.72 28.6,18.07 Q2.1
N$6
  Route15 0.6: J3.1 14.2,12.6 15.2,11.6 17.8,11.6 22.13,15.93 22.13,19.26 23.22,20.35 25.26,20.35 26.46,19.15 28.8,19.15 30.24,17.72 31.49,17.72 Q2.2
  Bottom 0.2: 100K-PY2.1 29.21,45 29.8,44.41 29.8,41.76 30.53,41.02 30.53,40.41 30.68,40.26 31.32,40.26 31.67,39.91 31.67,39.31 31.14,38.77 31.14,35.7 30.19,34.75 30.19,33.25 30.34,33.1 30.34,24.01 30.78,23.57 30.78,20.88 29.63,19.73 29.63,18.95 31.21,17.38 31.5,17.38 32.68,16.2 Q2.2
N$7  (via drill 0.35)
  Top 0.6: v49.6,12.93 49.81,13.14 4.7K-VBAT.S.2
  Top 0.75: J7.1 21.2,53.1 19.81,51.71 v19.2,51.71
  Top 1.5: J3.2 9.32,15.55 100K-VBAT.S.2
  Route2 1.5: J3.2 10.93,15.75 J4.2 16.27,19 J2.2 21.33,15.75 J5.2
  Route15 0.6: J4.2 14.18,21.02 13.32,21.89 13.32,22.89 15.24,24.82 15.24,34.93 13.32,36.86 13.32,38.11 14.43,39.23 14.43,46.2 14.43,48.03 15.4,49 17.6,49 19.2,50.6 v19.2,51.71 | J5.2 29.35,14.23 47.81,14.23 49.11,12.93 v49.6,12.93
N$8
  Bottom 0.2: 10K-PY3.2 32.81,41.26 31.18,42.89 100Ω-PY3.1 30.53,43.65 30.53,45.59 30.68,45.74 31.69,45.74 32.16,45.27 32.16,44.41 32.31,44.26 33.32,44.26 33.47,44.41 33.47,47.33 34.38,48.24 36.7,48.24 37.2,47.74 43.25,47.74 43.73,47.26 43.73,46.51 Q3.1
N$9
  Bottom 0.2: 31.18,44.91 100K-PY3.1 | 100K-PY3.1 31.18,44.91 | 31.18,44.91 31.81,44.29 31.81,44.26 32.33,43.74 42.5,43.74 42.57,43.67 46.25,43.67 Q3.2 | J4.1 13.53,14.57 25.05,14.57 28.24,17.77 28.24,40.33 28.16,40.41 28.16,41.27 27.69,41.74 27.2,41.74 26.53,42.41 26.53,43.59 26.68,43.74 27.2,44.26 27.69,44.26 28.16,44.73 28.16,45.59 28.31,45.74 29.32,45.74 30.15,44.91 30.15,42.2 30.61,41.74 31.69,41.74 32.16,41.27 32.16,40.41 32.31,40.26 33.56,40.26 33.6,40.3 33.6,41.6 33.2,42 32.94,42.26 32.31,42.26 31.84,42.73 31.84,43.59 31.18,44.24 100K-PY3.1
N$10
  Top 0.5: LED3-300Ω.2 50.13,10.07 LED3-GPS.2
N$11
  Top 0.2: CC2-5.1K.1 21.59,10.31 22.4,9.5 22.4,8.17 25.76,4.81 28.86,4.81 29.23,5.18 29.23,5.74 28.75,6.22 J1.A5
N$12
  Bottom 0.2: 100Ω-PY4.1 35.19,42.91 36.81,41.28 10K-PY4.2 43.82,41 46.02,38.79 46.02,36.43 44.7,35.11 31.54,35.11 30.89,34.46 30.89,33.6 30.89,33.54 31.54,32.9 34.67,32.9 35.86,31.7 35.86,20.6 32.04,20.6 30.89,19.46 30.89,18.54 31.8,17.64 40.17,17.64 Q4.1
N$13  (via drill 0.35)
  Route2 0.2: v42.86,44.33 44.98,42.2 v47.01,42.2
  Route2 0.6: J5.1 22.67,19 24.02,20.35 25.14,20.35 26.67,18.82 26.67,18.03 27.21,17.49 27.93,17.49 28.02,17.59 37.01,17.59 v38.4,16.2
  Route15 0.6: Q4.2 43.55,16.2 42.18,17.57 41.04,17.57 39.67,16.2 v38.4,16.2
  Bottom 0.2: J5.1 18.35,20.15 8.62,20.15 7.95,19.48 7.95,18.52 9.57,16.9 9.6,16.9 12.28,14.22 42.17,14.22 Q4.2 45.59,17.63 47.53,17.63 51.11,21.21 51.11,29.51 50.67,29.94 50.67,30.77 52.03,32.12 52.03,34.08 50.28,35.83 49.67,35.83 48.56,36.94 48.56,38.79 47.01,40.35 v47.01,42.2 | 100K-PY4.1 35.92,44.26 37.32,44.26 37.36,44.3 42.83,44.3 v42.86,44.33
N$14  (via drill 0.35)
  Top 0.2: CC1-5.1K.1 21.59,8.41 22.84,7.16 v22.84,6.84 | J1.B5 31.65,7.08 31.65,6.5 31.5,6.35 30.98,6.35 v30.7,6.07
  Route2 0.2: v30.7,6.07 26.29,6.07 26.01,5.79 24.21,5.79 23.16,6.84 v22.84,6.84
N$15
  Top 0.2: J1.A7 30.25,6.51 30.07,6.33 30.07,5.81 30.44,5.44 31.36,5.44 31.93,4.87 34.63,4.87 35.98,6.22 39.71,6.22 41.2,7.71 41.8,7.71 42.39,8.31 42.39,10.66 43.58,11.84 47.62,11.84 49.8,14.02 51.82,14.02 U4.1
N$16  (via drill 0.35)
  Top 0.2: U4.3 53.25,20.13 54.23,21.11 56.09,21.11 56.94,21.96 56.94,27.88 56.34,28.47 53.31,28.47 51.1,26.27 51.1,18.95 51.1,18.2 51.6,17.71 51.6,15.09 51.23,14.72 49.5,14.72 47.78,13 41.7,13 39.97,11.27 38.42,11.27 37.31,10.16 37.31,8.31 36.72,7.71 36.41,7.71 v35.8,7.1 | v32.2,4.1 31.21,5.09 30.29,5.09 29.72,5.66 29.72,6.48 29.75,6.51 J1.A6
  Route2 0.2: v35.8,7.1 35.8,6.94 32.96,4.1 v32.2,4.1
N$17
  Top 0.5: LED3-300Ω.1 49.73,11.99 4.7K-VBAT.S.1
N$18
  Top 0.75: CBOOT.2 22.75,48.14 U1.6
N$19
  Top 0.5: R2-10K.2 R1.2-5.1K.1 20.52,44.74 19.71,45.55 19.71,47.19 19.6,47.3 19.6,47.89 U1.4
N$20  (via drill 0.35)
  Top 0.5: L1.2 31.95,50.25 v31.2,51 | U1.2 20.55,50.2 20.55,49.61 20.83,49.33 21.67,49.33 22.33,49.99 CBOOT.1 22.96,50.05 22.96,52.22 v23.77,53.03
  Bottom 0.5: v31.2,51 29.47,52.73 24.07,52.73 v23.77,53.03
N$21
  Top 0.4: CIN.2 22.11,47.07 20.85,47.07 20.52,47.4 20.52,47.92 U1.5
  Top 0.5: U1.5 20.05,48.4 20.05,48.99 19.35,49.69 U1.3 | D2.1 23.18,42.96 CIN.2
  Top 0.75: Q0.2 19.2,50.45 U1.3 19,50.8 18.82,50.8 18.67,50.95 J7.2
N$22
  Top 0.5: R1.1-68K.1 18.88,40.74 19.69,41.55 19.69,42.89 18.88,43.7 R1.2-5.1K.2
N$23
  Top 0.75: F1.2 16.45,46.5 16.29,46.66 16.29,48.19 16.2,48.28 Q0.3
N$24
  Top 1.5: J6.P 14.45,41.55 14.45,41.52 14.97,41 F1.1
N$25  (via drill 0.35)
  Top 0.2: J1.B4_A9 32.4,6.3 v31.89,5.8 | J1.A4_B9 27.6,6.5 28.6,5.5 v28.6,5.44
  Top 0.6: D3.P1 28.27,11.47 28.18,11.47 27.47,10.75 27.47,8.23 27.6,8.09 J1.A4_B9 | U4.5 50.54,16.2 49.7,16.2 47.57,14.07 38.2,14.07 38.04,14.23 37.36,14.23 36.87,13.74 36.87,13.67 36,12.8 35.46,12.26 v35.46,11.8
  Route2 0.6: v35.46,11.8 34.36,10.7 33.26,10.7 32.55,9.99 32.55,8.89 31.89,8.24 v31.89,5.8 31.34,5.24 30.36,5.24 30.16,5.44 v28.6,5.44
NRST  (via drill 0.35)
  Top 0.2: v30.26,19.21 29.93,18.88 28.01,18.88 27.76,19.13 27.24,19.13 25.75,17.64 25.75,15.27 24.16,13.68 23.13,13.68 20.1,10.66 20.1,7.8 21.95,5.95 21.95,4.61 JP10.5
  Bottom 0.2: v30.26,19.21 30.54,19.49 30.54,19.87 31.14,20.46 31.14,23.72 30.7,24.16 30.7,33.24 30.54,33.4 30.54,34.6 31.77,35.83 32.73,35.83 33.84,36.94 33.84,38.79 34.43,39.39 40.69,39.39 JP2.5
PA13-SWDIO
  Route15 0.2: JP11.2 51.01,30.92 51.48,30.92 52.03,30.37 52.03,25.42 51.1,24.49 51.1,19.48 51.8,18.78 51.8,13.23 50.79,12.21 35.93,12.21 35.72,12.43 24.79,12.43 JP10.3
PA14-SWCLK
  Route15 0.2: JP11.3 51.63,31.27 52.7,30.2 52.7,24.8 52.7,24.7 51.6,23.6 51.6,20.3 52.2,19.7 52.2,13.13 50.92,11.84 36.39,11.84 35.72,11.17 24.97,11.17 20.53,6.73 JP10.4
PY1-A0
  Bottom 0.2: 47K-PY1.2 100K-PY1.2 23.18,44.91 20.52,42.25 20.52,40.94 20.62,40.84 20.62,36.43 19.36,35.17 18.69,35.17 18.1,34.57 18.1,34.5 17.67,34.5 16.7,35.47 13.83,35.47 13.5,35.13 13.23,35.13 JP5.7
PY2-A1
  Bottom 0.2: JP5.8 8.95,32.63 9.96,31.61 16.99,31.61 17.02,31.65 17.56,31.65 18.64,30.57 20.64,30.57 21.14,31.07 22.96,31.07 23.38,31.49 23.38,32 23.18,32.21 23.18,34.57 23.54,34.93 23.54,38.65 24.05,39.17 24.05,45.48 24.31,45.74 26.53,45.74 27.18,45.09 100K-PY2.2 47K-PY2.2
PY3-A2  (via drill 0.35)
  Route2 0.2: JP5.9 7.78,34.76 9.26,36.24 10.02,36.24 10.9,37.13 10.9,37.95 11.57,38.62 12.51,38.62 13.67,39.79 16.8,39.79 17.54,40.53 17.72,40.53 24.19,47 28.38,47 28.39,46.99 v29.9,46.99
  Bottom 0.2: 100K-PY3.2 47K-PY3.2 31.91,46.09 30.8,46.09 v29.9,46.99
PY4-A3  (via drill 0.35)
  Route2 0.2: JP5.10 5.88,35.4 7.92,35.4 9.12,36.6 9.87,36.6 10.55,37.27 10.55,38.4 10.55,38.52 11,38.98 12.36,38.98 20.74,47.35 29.37,47.35 29.64,47.62 30.16,47.62 30.78,47 v43.1,47
  Bottom 0.2: v43.1,47 47K-PY4.2 36.02,47.8 34.7,47.8 34,47.1 34,46.7 34.6,46.1 35.1,46.1 35.72,46.1 100K-PY4.2
SIG
  Top 0.2: SERVO1.3 16.24,30.44 SERVO1-10K.1
SIG1
  Top 0.2: SERVO2.3 11.8,30.44 12.98,31.61 16.99,31.61 17.02,31.65 18.04,31.65 SERVO2-10K.1
SIG2
  Top 0.2: SERVO3-10K.1 22.56,30 21.65,29.09 21.06,29.09 20.06,28.09 19.74,28.09 18.73,29.09 16.35,29.09 16.02,29.43 8.01,29.43 SERVO3.3
SIG3
  Top 0.2: SERVO4.3 4.87,29.07 15.87,29.07 16.2,28.74 18.59,28.74 19.59,27.73 20.21,27.73 21.21,28.74 22.67,28.74 23.34,29.41 23.34,30.27 23.97,30.9 24.1,30.9 24.79,30.9 SERVO4-10K.1
V  (via drill 0.35)
  Top 0.5: C2.2 C3.2 30.3,48.3 31.3,47.3 31.3,41.26 30.87,40.84 | 30.87,40.84 36.48,40.84 L1.1 44.64,41.36 D1.P1 43.4,42.6 v42.8,42.6 | R1.1-68K.2 21.05,40.2 21.36,39.89 22.07,39.89 23.02,40.84 30.87,40.84
  Route2 0.5: SERVO4.2 SERVO3.2 SERVO2.2 SERVO1.2 18.1,27.9 C1.1 | v42.8,42.6 20.83,42.6 v17.8,39.57
  Route15 0.5: C1.1 18.09,27.91 18.09,31.34 17.85,31.58 v17.85,35.22
  Bottom 0.6: v17.85,35.22 17.85,35.91 18.28,36.34 18.28,39.08 v17.8,39.57

## Text on the board
bPlace: And no one hears a word they say / Has the memory gone? Are you feeling numb? / Not a word they say / But a voiceless crowd isn't backing down / When the air turns red / With their loaded hesitation / Can you say my name? / Has the memory gone? Are you feeling numb? / Have we all become invisible? | i spent like more than 24 hours on this you better fly